# Altium PCB Tiny_Matrix_PCB.PcbDoc
Units mil, origin at the board's own origin, x right, y up, seen from the top; angles counter-clockwise.
Board outline 1265 x 2840 mil, 2 copper layers (Top Layer, Bottom Layer); 11 components, 11 nets, 54 pads, 1 vias.
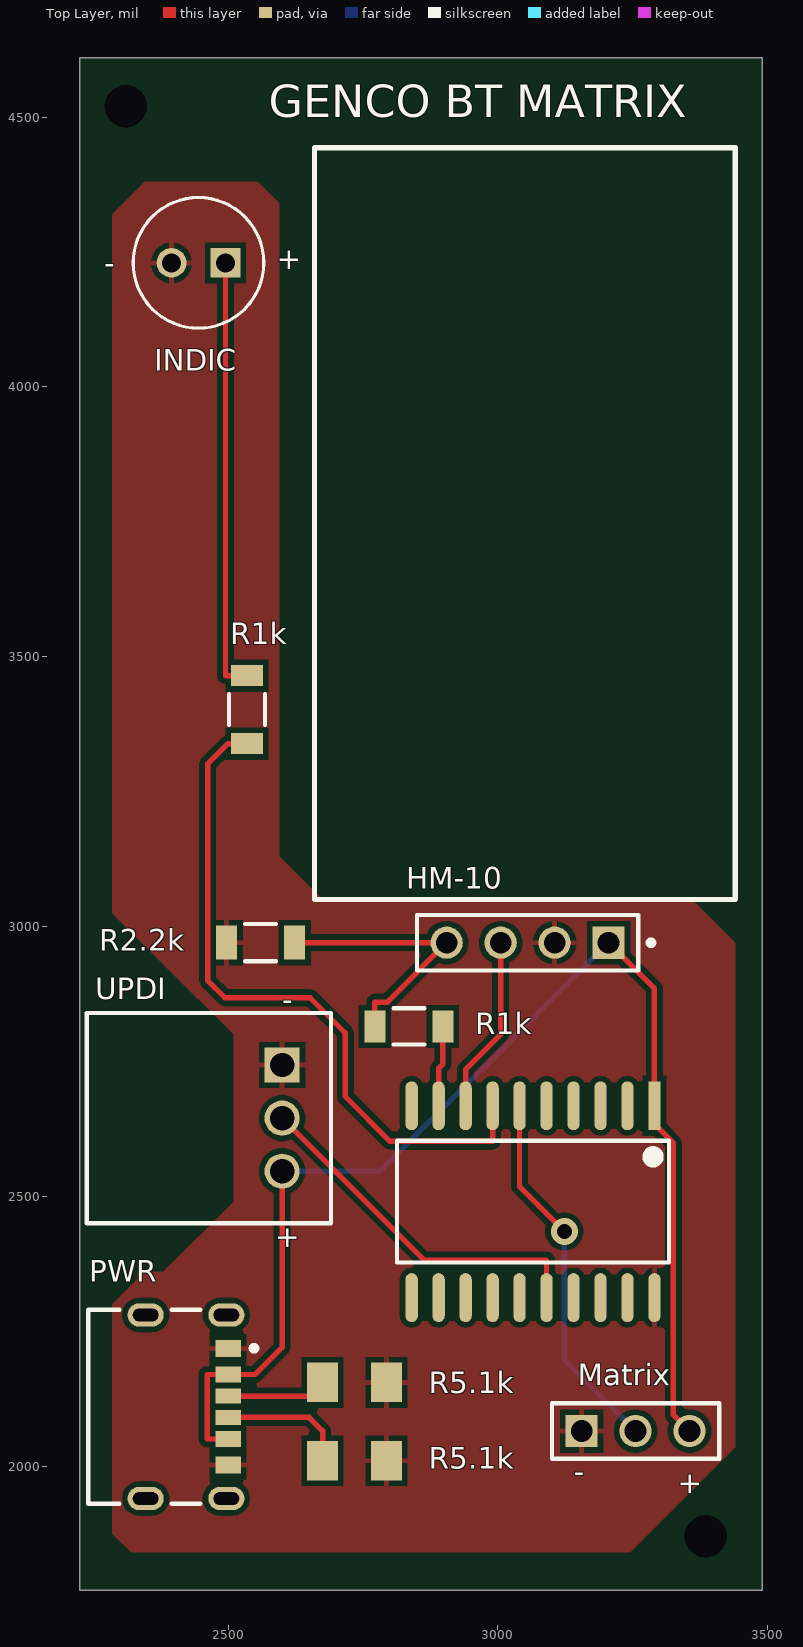
[diagram p0: Top Layer view]
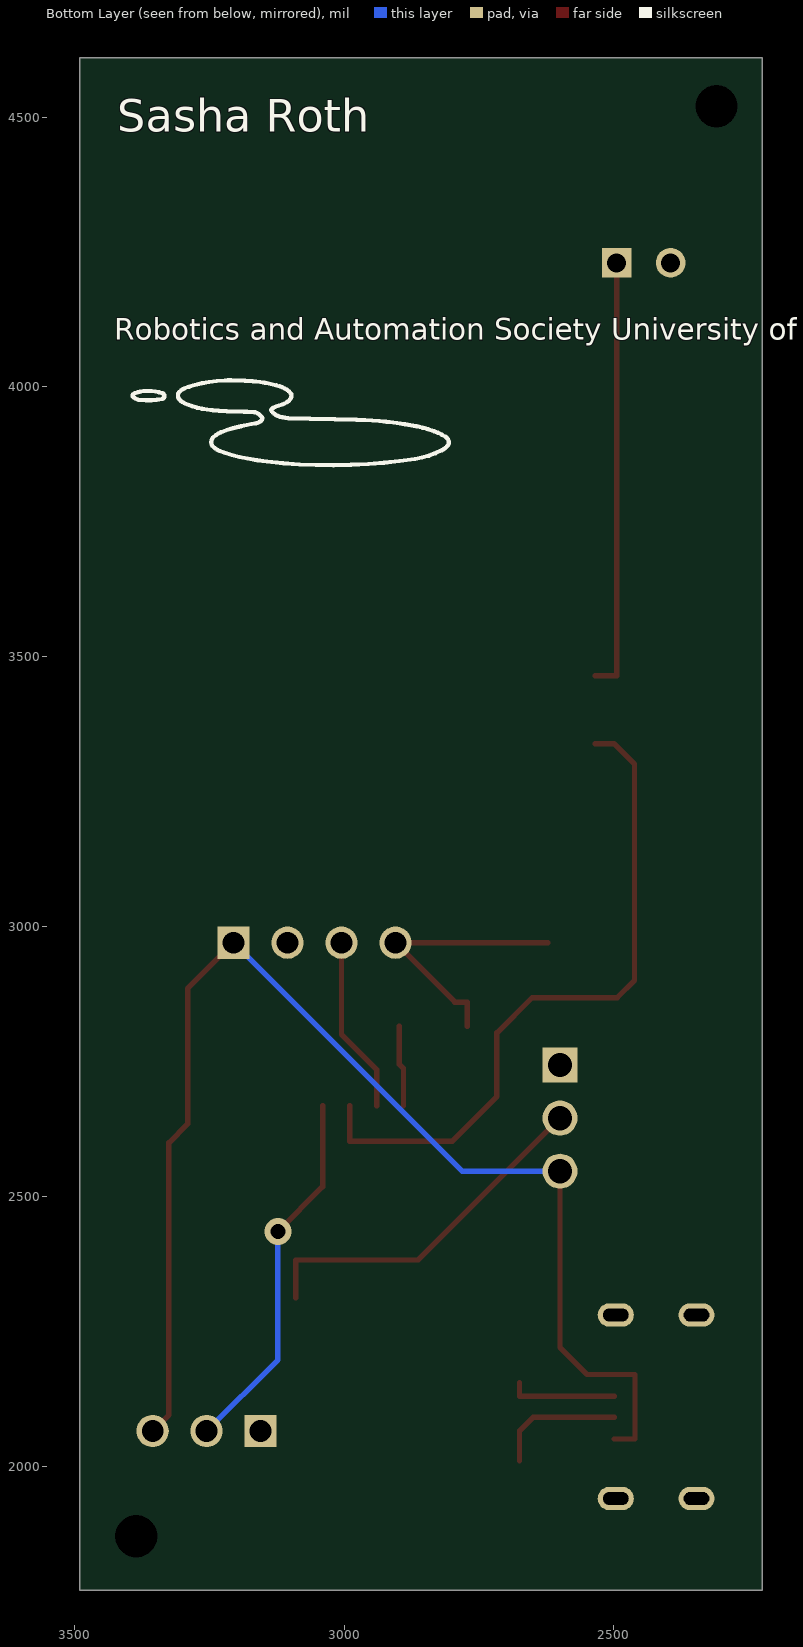
[diagram p1: Bottom Layer view, seen from below]
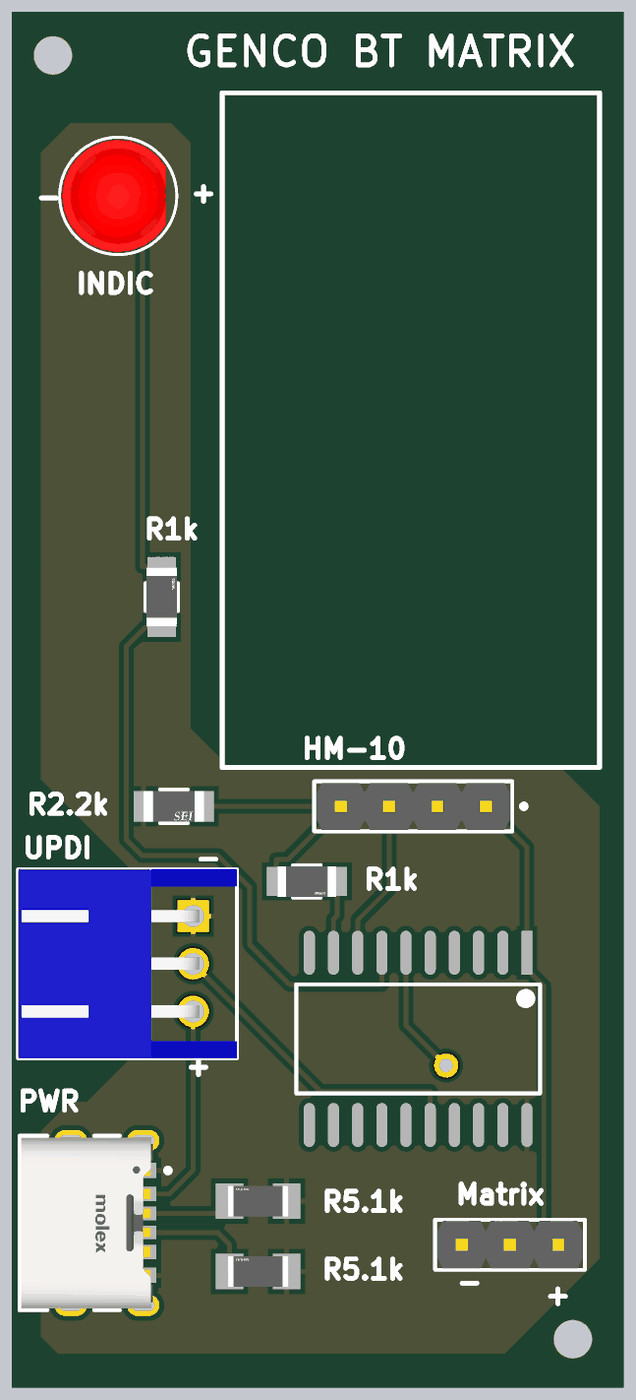
[diagram p2: 3D render of the assembled board from above, using the file's embedded part models]

## Layer stack, top to bottom
Top Solder: solder mask 0.4, Solder Resist, Dk 3.5
Top Layer: signal copper 1.4
Dielectric 1: dielectric 12.6, FR-4, Dk 4.8
Bottom Layer: signal copper 1.4
Bottom Solder: solder mask 0.4, Solder Resist, Dk 3.5

## Board outline
2225,1770 2225,4610 3490,4610 3490,1770

## Design rules (kind name [scope] priority, off if disabled: settings)
Clearance [All] p1: gap=10 ignorepadtopadclearanceinfootprint=FALSE except(31.5: Arc-Hole Track-Hole)
PolygonConnect [All] p1: connectstyle=Relief reliefconductorwidth=10 reliefentries=4 polygonreliefangle="90 Angle" airgapwidth=10
RoutingVias [All] p1: holewidth=28 width=50 viastyle="Through Hole" minholewidth=28 minwidth=50 maxholewidth=28 maxwidth=50
SolderMaskExpansion [All] p1: expansion=4 istentingtop=FALSE
SupplyNets "Schematic Supply Nets_1" [InNet('+5')] p1: voltage=0.000
SupplyNets "Schematic Supply Nets" [InNet('GND')] p2: voltage=0.000
Width [All] p1: maxlimit=10 minlimit=10 preferedwidth=10
30 further rules are at their usual default settings.

## Classes and differential pairs
component class Tiny_Matrix_Sch: HM-10 INDIC Matrix PWR R2.2k UPDI

## Components (designator, comment, footprint, x,y, rotation, side; value= is the part's Value field where it differs from the comment)
HM-10 "BT Module" FP-MTLW-104-05-G-S-185-MFG 3055,2970 r180 top
INDIC "L-57IID" FP-L-57IID-MFG 2445,4230 r270 top
Matrix "MTLW-103-07-G-S-230" FP-MTLW-103-07-G-S-230-MFG 3255,2065 r0 top
PWR "217175-0001" FP-217175-0001-MFG 2380.51,2110 r270 top (schematic designator UPDIF)
R1k "AT1206FRE071KL" FP-AT1206-MFG 2835,2815 r0 top
R1k "AT1206FRE071KL" FP-AT1206-MFG 2535,3402.01 r90 top (schematic designator R_INDIC)
R2.2k "RMCF1206JG2K20" FP-RMCF1206-MFG 2560,2970 r0 top (schematic designator R22k)
R5.1k "ESR18EZPF5101" FP-ESR18-IPC_A 2734.1,2010 r0 top (schematic designator R51kB)
R5.1k "ESR18EZPF5101" FP-ESR18-IPC_A 2734.1,2155 r0 top (schematic designator R51kA)
U? "ATTINY3216-SN" FP-C04-094-IPC_B 3065,2490 r270 top
UPDI "S3B-XH-A(LF)(SN)" JST-S3B-XH-A(LF)(SN)_V 2600,2645 r270 top (schematic designator Prgrmmr)

## Footprints (in the part's own frame and the unit in brackets; to place one, negate y for a bottom-side part, rotate by r counter-clockwise, add the part's x,y. Pads: shape width x height; smd on the part's side, far side on the other; paste and mask are expansions set on the pad)
FP-217175-0001-MFG [mm]
  rrect100% 1.1x1.7 hole 1.2 slot 0.6 at 0 deg paste-2539.97 mask+0: 1(-4.32,2.95) 2(4.32,2.95) 3(-4.32,-0.85) 4(4.32,-0.85)
  rect 0.7x1.2 smd paste+0 mask+0: A5(-0.5,3.03) B5(0.5,3.03)
  rect 0.76x1.2 smd paste+0 mask+0: A9(1.52,3.03) B9(-1.52,3.03)
  rect 0.8x1.2 smd paste+0 mask+0: A12(2.75,3.03) B12(-2.75,3.03)
  silkscreen extent -4.57,-3.55 4.57,4.38, body extent -4.97,-3.65 4.97,3.9, height 0.25
FP-AT1206-MFG [mm]
  rect 1x1.5 smd paste+0 mask+0: 1(-1.6,0) 2(1.6,0)
  silkscreen extent -0.73,-0.85 0.73,0.85, body extent -2.2,-0.95 2.2,0.95, height 0.25
FP-C04-094-IPC_B [mil]
  rect 90.66x22.92 smd paste+0 mask+0: 1(-177.78,225)
  rrect100% 90.66x22.92 smd paste+0 mask+0: 2(-177.78,175) 3(-177.78,125) 4(-177.78,75) 5(-177.78,25) 6(-177.78,-25) 7(-177.78,-75) 8(-177.78,-125) 9(-177.78,-175) 10(-177.78,-225) 11(177.78,-225) 12(177.78,-175) 13(177.78,-125) 14(177.78,-75) 15(177.78,-25) 16(177.78,25) 17(177.78,75) 18(177.78,125) 19(177.78,175) 20(177.78,225)
  silkscreen extent -113,-252 113,252
FP-ESR18-IPC_A [mil]
  rect 57.31x73.16 smd paste+0 mask+0: 1(-59.1,0) 2(59.1,0)
  body extent -107,-56 107,56, height 10
FP-L-57IID-MFG [mm]
  rect 1.4x1.4 hole 0.9 paste-2539.97 mask+0: 1(0,1.27)
  round 1.4 hole 0.9 paste-2539.97 mask+0: 2(0,-1.27)
  silkscreen extent -3.08,-3.08 3.08,3.08, body extent -3.17,-3.17 3.17,3.17, height 0.25
FP-MTLW-103-07-G-S-230-MFG [mm]
  rect 1.52x1.52 hole 1.02 paste-2539.97 mask+0: 1(-2.54,0)
  round 1.52 hole 1.02 paste-2539.97 mask+0: 2(0,0) 3(2.54,0)
  silkscreen extent -3.94,-1.31 3.94,1.31, body extent -4.04,-1.41 4.04,1.41, height 0.25
FP-MTLW-104-05-G-S-185-MFG [mm]
  rect 1.52x1.52 hole 1.02 paste-2539.97 mask+0: 1(-3.81,0)
  round 1.52 hole 1.02 paste-2539.97 mask+0: 2(-1.27,0) 3(1.27,0) 4(3.81,0)
  silkscreen extent -5.93,-1.31 5.21,1.31, body extent -5.31,-1.41 5.31,1.41, height 0.25
FP-RMCF1206-MFG [mm]
  rect 1x1.6 smd paste+0 mask+0: 1(-1.6,0) 2(1.6,0)
  silkscreen extent -0.73,-0.87 0.73,0.87, body extent -2.2,-0.97 2.2,0.97, height 0.25
JST-S3B-XH-A(LF)(SN)_V [mm] "Header, 3-Leads, Body 9.9x11.5mm, Pitch 2.5mm"
  rect 1.65x1.65 hole 1.15: 1(-2.5,0)
  round 1.65 hole 1.15: 2(0,0) 3(2.5,0)
  silkscreen extent -4.95,-9.2 4.95,2.3, body extent -4.95,-9.2 4.95,2.3, height 6.15

## Part data
HM-10: library part CMP-02766-000562-1, "CONN HEADER VERT 4POS 2.54MM", Color=Black, Contact Resistance=15mR, Max Operating Temperature=105°C, Min Operating Temperature=-40°C, Connector Type="Male Pin", Contact Material=Brass, Contact Mating Length=0.185inch, Contact Plating=Gold, Depth=2.48mm, Gender=Male, Height=6.4mm, Housing Color=Black, Housing Material=Polymer, Length=29.64mm, Mount="Through Hole", Number of Contacts=4, Number of Positions=4, Number of Rows=1, Orientation=Straight, Packaging=Rail/Tube, Pitch=2.54mm, Radiation Hardening=No, Termination=Solder
INDIC: library part CMP-44529-000063-1, "LED RED DIFFUSED T-1 3/4 T/H", Color=Red, Forward Current=20mA, Forward Voltage=2V, Dominant Wavelength=625nm, Lens Color=Red, Lens Style=Circular, Luminous Intensity=20mcd, Mount="Through Hole", Number of LEDs=2, Number of Pins=2, Radiation Hardening=No, REACH SVHC="No SVHC", RoHS Compliant=Yes, Viewing Angle=60°, Wavelength=625nm
Matrix: library part CMP-02766-001679-1, "CONN HEADER VERT 3POS 2.54MM", Housing Color=Black, Max Current Rating=3A, Max Operating Temperature=125°C, Min Operating Temperature=-55°C, Contact Material=Bronze, Contact Plating=Gold, Depth=2.48mm, Gender=Male, Housing Material=Polymer, Length=7.62mm, Number of Contacts=3, Number of Rows=1, Orientation=Straight, Packaging=Bulk, Pitch=2.54mm, Radiation Hardening=No, RoHS Compliant=Yes, Termination=Solder
PWR: library part CMP-04767-000026-1, "CONN RCP USB2.0 C 6+18P SMD RA"
R1k R1k: library part CMP-03412-039742-1, "Thin Film Chip Resistors Automotive Grade 1kΩ 1% 50ppm/°C 1206"
R2.2k: library part CMP-26527-006686-1, "2.2kΩ ±5% 0.25W 1206 Thick Film Chip Resistor AEC-Q200 compliant", Case/Package=1206, Max Operating Temperature=155°C, Max Power Dissipation=250mW, Min Operating Temperature=-55°C, Resistance=2.2kR, Resistor Type="Thick Film", Temperature Coefficient=200ppm/°C, Tolerance=5%, Contact Plating=Tin, Features="Automotive AEC-Q200", Height=0.028inch, Length=0.126inch, Mount="Surface Mount", Number of Terminations=2, Packaging="Tape and Reel", Radiation Hardening=No, RoHS Compliant=Yes, Series=RMCF, Width=0.063inch
R5.1k R5.1k: library part CMP-08839-028234-1, "5.1kΩ ±1% 0.5W 1206 Anti-Surge Chip Resistor AEC-Q200", Case/Package=1206, Max Operating Temperature=155°C, Max Power Dissipation=333mW, Min Operating Temperature=-55°C, Package Quantity=5000, Resistance=5.1kR, Resistor Type="Thick Film", Temperature Coefficient=100ppm/°C, Tolerance=1%, Features="Automotive AEC-Q200", Height=0.026inch, Length=0.126inch, Number of Terminations=2, Packaging="Tape and Reel", RoHS Compliant=Yes, Series=ESR18, Width=0.063inch
U?: library part CMP-06276-000249-1, "IC MCU 8BIT 32KB FLASH 20SOIC", Case/Package=SOIC, Max Operating Temperature=105°C, Min Operating Temperature=-40°C, Core Architecture=AVR, Interface=I2C, Memory Size=32KB, Memory Type=FLASH, Mount="Surface Mount", Number of I/Os=18, Oscillator Type=Internal, Packaging=Rail/Tube, Peripherals="Brown-out Detect/Reset", RoHS Compliant=Yes, Series="tinyAVR™ 1"
UPDI: library part CMP-1755-00006-1, "Male Header, Pitch 2.5 mm, 1 x 3 Position, Height 6.1 mm, Tail Length 3.4 mm, -25 to 85 degC, RoHS, Bulk", Case\Package=DIP, Frequency="1.8 MHz", Max Operating Temperature="70 degC", Max Ouput Current="-10 mA", Max Power Dissipation="1 W", Max Supply Voltage="15 V", Min Operating Temperature="0 degC", Min Supply Voltage="1 V", Nominal Supply Current="170 uA", Package Quantity=50, Channels=1, ComponentLink1Description="Manufacturer URL", ComponentLink1URL=http://www.jst.com/home2.html, ComponentLink2Description=Datasheet, ComponentLink2URL=http://www.jst-mfg.com/product/pdf/eng/eXH.pdf, DatasheetVersion=May-16, Height="4.57 mm", Length="9.81 mm", Mount="Through Hole", PackageDescription="Male Header, Pitch 2.5 mm, 1 x 3 Position, Height 6.1 mm, Tail Length 3.4 mm", PackageReference=S3B-XH-A(LF)(SN), Packaging=Rail/Tube, Pins=8, Radiation Hardening=No, REACH SVHC="No SVHC", RoHSCompliant=true, Weight="0.015535 oz", Width="6.35 mm"

## Free pads (board coordinates)
  round 0 hole 78.74: 2(2310,4520) 3(3385,1870)

## Via types
v1: diameter 50, hole 28, Top Layer to Bottom Layer, 1 vias

## Nets (pads, with @x,y where several pads share a name; then routed paths per layer and width w, separated by ;. In a path a pad name is that pad's centre, name@x,y a point inside that pad or via, vN(x,y) a via of type N, cw(c..) or ccw(c..) an arc to the next point about the centre after c; other vN are vias at no path point)
+5: HM-10.1 Matrix.3 PWR.A9 PWR.B9 U?.1 UPDI.3 | length 2392.5
  Top Layer w10: PWR.A9 2461,2050.16 2461,2169.84 PWR.B9 2550,2169.84 2600,2219.84 UPDI.3 ; HM-10.1 3290,2885 U?.1 3290,2634 3325,2599 3325,2095 Matrix.3
  Bottom Layer w10: UPDI.3 2781.57,2546.57 HM-10.1
GND: HM-10.2 INDIC.2 Matrix.1 PWR.A12 PWR.B12 R2.2k.1 R5.1k.2 U?.20 UPDI.1
INDIC_DATA: R1k.1@2535,3339.02 U?.7 | length 1276.1
  Top Layer w10: R1k.1@2535,3339.02 2500,3339.02 2462,3301.02 2462,2900 2494,2868 2652,2868 2717,2803 2717,2685 2800,2602 2990,2602 U?.7
MATRIX_DATA: Matrix.2 U?.6 | length 691.8
  Top Layer w10: U?.6 3040,2518 v1(3123,2435)
  Bottom Layer w10: v1(3123,2435) 3123,2197 Matrix.2
NetHM-10_3: HM-10.3 U?.8 | length 329.1
  Top Layer w10: U?.8 2940,2735 3005,2800 HM-10.3
NetHM-10_4: HM-10.4 R1k.1@2772.01,2815 R2.2k.2 | length 505.6
  Top Layer w10: R2.2k.2 HM-10.4 2795.01,2860.01 2772.01,2860.01 R1k.1@2772.01,2815
NetINDIC_1: INDIC.1 R1k.2@2535,3465 | length 805
  Top Layer w10: INDIC.1 2495,3465 R1k.2@2535,3465
NetPrgrmmr_2: U?.16 UPDI.2 | length 668.7
  Top Layer w10: UPDI.2 2863,2382 3090,2382 U?.16
NetR1k_2: R1k.2@2897.99,2815 U?.9 | length 150.5
  Top Layer w10: U?.9 2890,2737 2897.99,2744.99 R1k.2@2897.99,2815
NetR51kA_1: PWR.A5 R5.1k.1@2675,2155 | length 200.5
  Top Layer w10: PWR.A5 2675,2129.69 R5.1k.1@2675,2155
NetR51kB_1: PWR.B5 R5.1k.1@2675,2010 | length 240.9
  Top Layer w10: PWR.B5 2650,2090.32 2675,2065.32 R5.1k.1@2675,2010
pads on no net: PWR.1 PWR.2 PWR.3 PWR.4 U?.2 U?.3 U?.4 U?.5 U?.10 U?.11 U?.12 U?.13 U?.14 U?.15 U?.17 U?.18 U?.19

## Polygon pours and split planes (outlines as drawn)
GND on Top Layer "GND_L01_P000" (solid, pour order 0): 3245,1840 3440,2035 3440,2970 3360,3050 2675,3050 2595,3130 2595,4340 2555,4380 2345,4380 2285,4320 2285,3025 2380,2930 2510,2800 2510,2490 2380,2360 2332.5,2360 2332.5,2347.5 2285,2300 2285,1875 2320,1840

## Silkscreen, mask and mechanical layers (free items; w line width, h text height)
Top Overlay:
  lines w10: 2660,3050 3440,3050 3440,4442.91 2660,4442.91 2660,3050
  text "GENCO BT MATRIX" at 2575,4500 h60
  text "+" at 2590,4218.34 h40
  text "-" at 2270,4210.01 h40
  text "-" at 2600,2845.01 h40
  text "+" at 2626.66,2400 h40 r90
  text "+" at 3338.34,1990 h40 r270
  text "-" at 3140,1970.01 h40
Bottom Overlay:
  lines w7.87: 2805.96,3896.47 cw(c2819.07,3896.47) 2812.15,3907.6 cw(c2872.67,3810.22) 2833.38,3917.94 cw(c2908.7,3711.47) 2865.75,3927.01 cw(c2986.84,3319.31) 2908.96,3934.04 cw(c2992.42,3275.23) 2934.69,3936.79 cw(c2995.51,3239.8) 2960.85,3938.58 cw(c3019.9,2748.04) 2993.43,3939.75 cw(c3107.96,-1216.71) 3040.96,3940.59 ccw(c2919.98,13253.42) 3086.03,3941.28 ccw(c3080.31,4262.42) 3103.78,3942.09 ccw(c3098.25,4017.63) 3114.49,3943.65 ccw(c3103.38,3994.27) 3123.86,3946.66 ccw(c3115.07,3967.1) 3127.66,3948.76 ccw(c3110.13,3974.28) 3131.34,3951.73 ccw(c3112.27,3972.01) 3134.17,3954.82 ccw(c3131.25,3957.11) 3134.96,3957.11 ccw(c3132.02,3957.11) 3134.25,3959.02 ccw(c3126.55,3952.4) 3132.1,3960.91 ccw(c3120.98,3943.87) 3128.59,3962.74 ccw(c3105.78,3906.2) 3123.66,3964.48 cw(c3153.78,4062.65) 3106.21,3971.65 cw(c3114.15,3986.85) 3098.35,3980.2 cw(c3106.2,3983.5) 3099.66,3988.97 cw(c3124.6,3968.13) 3109.92,3997.13 cw(c3139.6,3938.53) 3119.45,4001.05 cw(c3174.31,3830.81) 3132.26,4004.65 cw(c3185.71,3783.66) 3147.23,4007.75 cw(c3199.34,3704.28) 3163.57,4010.1 cw(c3185.17,3825.43) 3175.3,4011.1 cw(c3219.84,3173.43) 3192.64,4011.84 cw(c3219.97,3169.82) 3209.95,4012.23 cw(c3212.02,3838.49) 3221.46,4011.98 cw(c3203.8,3687.63) 3250.59,4009.08 cw(c3218.21,3786.6) 3276.72,4003.67 cw(c3231.4,3835.54) 3297.25,3996.74 cw(c3289.53,3977.85) 3306.6,3989.03 cw(c3298.93,3984) 3308.07,3983.27 cw(c3296.86,3984.17) 3305.84,3977.4 cw(c3288.42,3990.53) 3299.72,3971.86 cw(c3269.57,4021.71) 3290.15,3967.21 cw(c3230.38,4125.47) 3272.54,3961.64 cw(c3230.62,4124.53) 3254.45,3958.03 cw(c3218,4212.67) 3232.54,3955.84 cw(c3183.12,4828.79) 3202.46,3954.66 ccw(c3249.3,1836.99) 3185.77,3954.23 ccw(c3199.25,3505.04) 3174.59,3953.75 ccw(c3190.17,3670.16) 3166.82,3953.22 ccw(c3167.93,3939.76) 3163.51,3952.52 ccw(c3168.91,3936.92) 3159.72,3950.64 ccw(c3176.58,3925.47) 3155.86,3947.56 ccw(c3175.22,3926.92) 3152.83,3944.23 ccw(c3156.11,3941.69) 3151.96,3941.69 ccw(c3156.96,3941.69) 3152.79,3938.94 ccw(c3162.51,3945.35) 3155.21,3936.28 ccw(c3165.16,3948.65) 3158.79,3934.1 ccw(c3166.74,3952.27) 3163.02,3932.79 cw(c2452.15,210.96) 3180.39,3929.43 cw(c3065.83,3344.5) 3191.08,3927.24 cw(c3131.32,3649.21) 3198.99,3925.42 cw(c3145.82,3708.39) 3206.39,3923.47 cw(c3151.08,3727.05) 3228.66,3915.79 cw(c3211.55,3874.17) 3242.06,3907.25 cw(c3233.06,3897.49) 3246.3,3898.42 cw(c3235.08,3897.63) 3243.03,3889.68 cw(c3216.58,3916.14) 3230.63,3881.47 cw(c3152.49,4074.25) 3208.51,3873.92 cw(c3123.5,4177.89) 3179.2,3867.21 cw(c3057.33,4547.05) 3142.96,3861.7 cw(c3034.73,4727.91) 3052.29,3855.14 cw(c3029.36,4994.66) 2955.11,3857.33 cw(c3024.3,4917.06) 2868.54,3866.56 cw(c2891.41,4020.78) 2818.69,3882.87 cw(c2836.91,3917.42) 2813.73,3885.98 cw(c2831.56,3910.17) 2809.62,3889.63 cw(c2825.79,3904.76) 2806.84,3893.31 cw(c2812.07,3896.47) 2805.96,3896.47 ; 3333.16,3984.01 cw(c3338.65,3983.22) 3336.97,3988.51 cw(c3362.86,3907.04) 3349.68,3991.5 cw(c3364.27,3898.01) 3364.82,3992.63 cw(c3364.43,3925.67) 3378.65,3991.11 cw(c3361.09,3910.33) 3386.61,3988.95 cw(c3382.68,3976.83) 3391,3986.49 cw(c3388.98,3984.15) 3392.05,3983.78 cw(c3387.56,3984.32) 3390.51,3980.9 cw(c3376.36,3997.34) 3378.57,3975.76 cw(c3364.65,4112.01) 3357.23,3975.26 cw(c3364.3,4105.49) 3337.47,3977.85 cw(c3338.6,3983.23) 3333.16,3984.01
  text "Sasha Roth" at 3420.65,4472.71 h60
  text "Robotics and Automation Society University of Pittsburgh 2026" at 3425.65,4087.71 h40